# EAGLE board メイン基盤 (EAGLE 9.7.0)
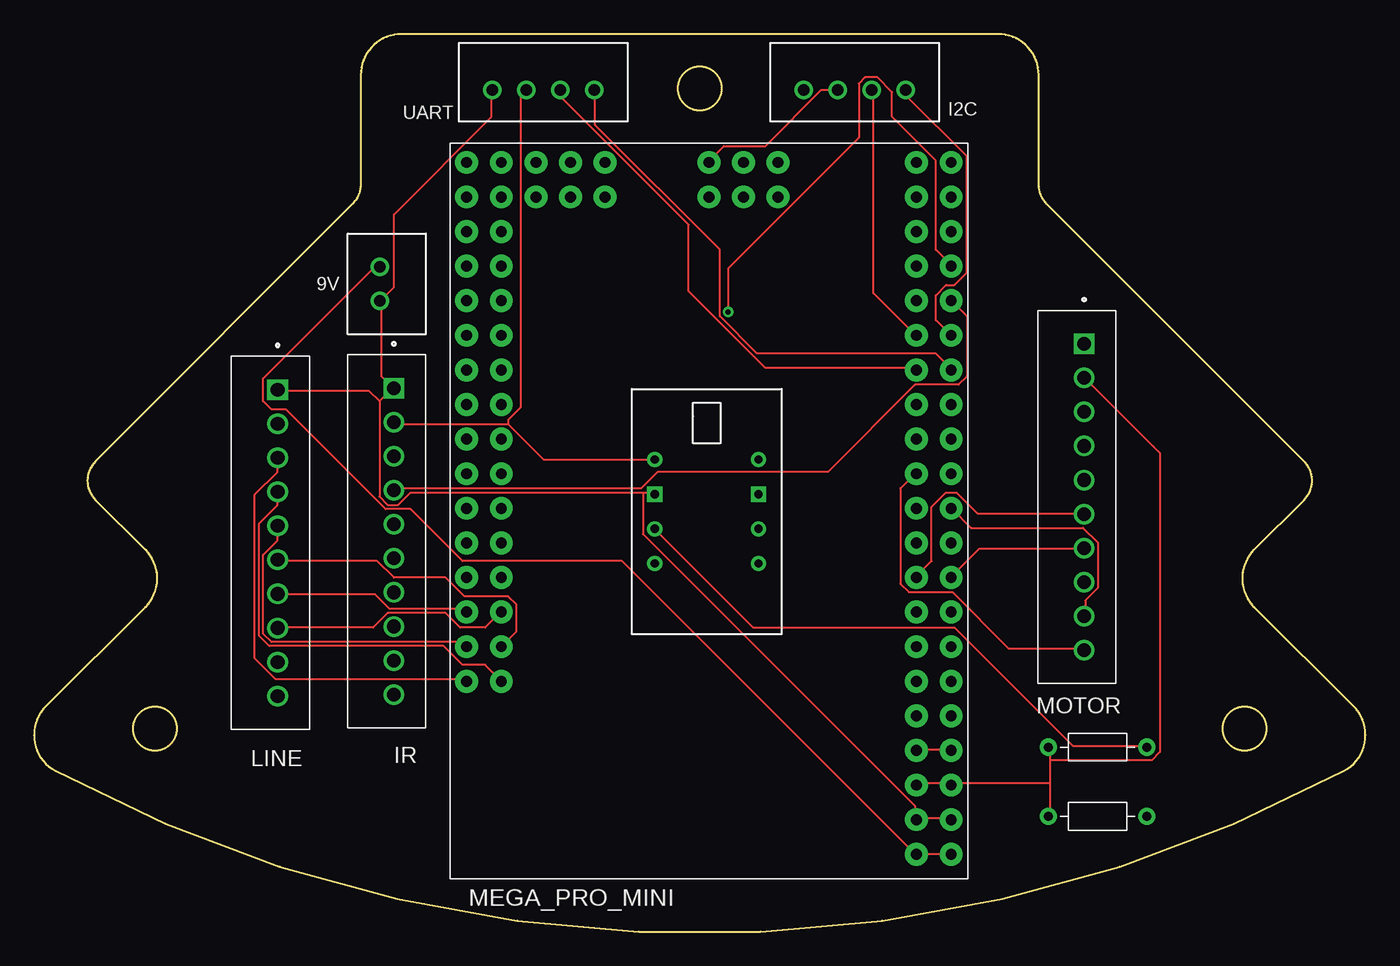
[diagram p0: board, top side]
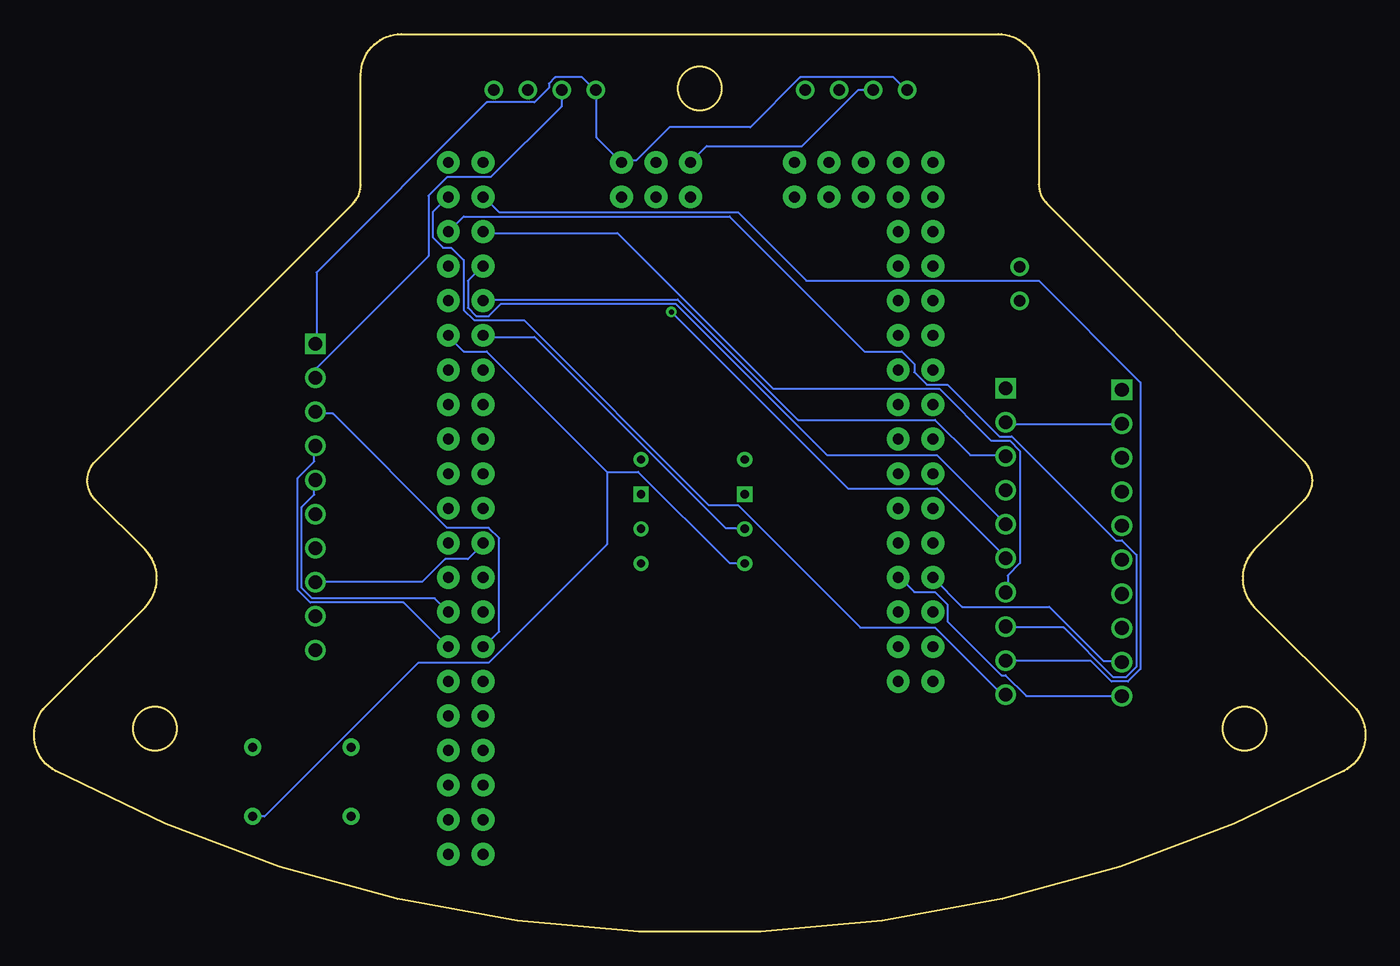
[diagram p1: board, bottom side, seen from below]

Size 97.74 x 65.9 mm. Coordinates in mm from the lower left corner, seen from the top.
Outline: 1.58,11.79 arc56 96.16,11.79 arc107 96.86,16.55 89.6,23.81 arc-90 89.6,28.06 93.24,31.7 arc90 93.24,34.53 74.35,53.42 arc-45 73.76,54.84 73.76,62.9 arc90 70.76,65.9 26.98,65.9 arc90 23.98,62.9 23.98,54.86 arc-45 23.4,53.45 4.5,34.52 arc90 4.5,31.7 8.14,28.06 arc-90 8.14,23.81 0.88,16.55 arc107 1.58,11.79
Outline: circle at 48.87,61.9 radius 1.6
Outline: circle at 8.87,14.9 radius 1.6
Outline: circle at 88.87,14.9 radius 1.6
Copper layers (1*16): Top / Bottom
Stack-up Default Layer Stack: Top User Defined 0.035mm / Dielectric-1 User Defined 1.5mm / Bottom User Defined 0.035mm
Design rules: minimum drill size 0.35mm, minimum copper width all 20mil, minimum copper width 6mil, keepout clearance 0mil, drill distance 6mil, via restrict clearance 0mil, dimension clearance 40mil, restrict clearance 20mil, copper clearance wire_polygon to wire_polygon 6mil, copper clearance wire_polygon to pad_smd 6mil, copper clearance wire_polygon to via 6mil, copper clearance pad_smd to pad_smd 6mil, copper clearance pad_smd to via 6mil, copper clearance via to via 6mil, copper clearance smd to pad (same net) 6mil, copper clearance smd to via (same net) 6mil, copper clearance smd to smd (same net) 6mil

## Footprints (pad centres in the part's own frame; a part is rotated, then mirrored left to right if it is on the bottom)
B2B-XH-A = drill 0.84: 1 0,0; 2 2.5,0
BNO055 = drill 0.6 square: GND -1.27,-3.81; GND2 -1.27,3.81 | drill 0.6: INT 1.27,3.81; RESET 3.81,3.81; SCL 3.81,-3.81; SDA 1.27,-3.81; VIN -3.81,-3.81; VOUT -3.81,3.81
B4B-XH-A = drill 0.84: 1 0,0; 2 2.5,0; 3 5,0; 4 7.5,0
JST_B10B-XH-A(LF)(SN) = drill 1 square: 1 11.25,-0.525 | drill 1: 2 8.75,-0.525; 3 6.25,-0.525; 4 3.75,-0.525; 5 1.25,-0.525; 6 -1.25,-0.525; 7 -3.75,-0.525; 8 -6.25,-0.525; 9 -8.75,-0.525; 10 -11.25,-0.525
MODULE_MEGA_PRO_EMBED_CH340G_/_ATMEGA2560 = drill 0.8 pad 1.676: 3V3_1 -17.58,-17.78; 3V3_2 -17.58,-15.24; 5V_1 -20.12,-17.78; 5V_2 -20.12,-15.24; 5V_3 25.6,0; A0 -12.5,17.78; A1 -12.5,15.24; A2 -9.96,17.78; A3 -9.96,15.24; A4 -7.42,17.78; A5 -7.42,15.24; A6 -4.88,17.78; A7 -4.88,15.24; A8 -2.34,17.78; A9 -2.34,15.24; A10 0.2,17.78; A11 0.2,15.24; A12 2.74,17.78; A13 2.74,15.24; A14 5.28,17.78; A15 5.28,15.24; AREF -15.04,-15.24; D2 -9.96,-15.24; D3 -9.96,-17.78; D4 -7.42,-15.24; D5 -7.42,-17.78; D6 -4.88,-15.24; D7 -4.88,-17.78; D8 -2.34,-15.24; D9 -2.34,-17.78; D10 0.2,-15.24; D11 0.2,-17.78; D12 2.74,-15.24; D13 2.74,-17.78; D14 5.28,-15.24; D15 5.28,-17.78; D16 7.82,-15.24; D17 7.82,-17.78; D18 10.36,-15.24; D19 10.36,-17.78; D20 12.9,-15.24; D21 12.9,-17.78; D22 15.44,-15.24; D23 15.44,-17.78; D24 17.98,-15.24; D25 17.98,-17.78; D26 20.52,-15.24; D27 20.52,-17.78; D28 23.06,-15.24; D29 23.06,-17.78; D30 25.6,-15.24; D31 25.6,-17.78; D32 7.82,17.78; D33 7.82,15.24; D34 10.36,17.78; D35 10.36,15.24; D36 12.9,17.78; D37 12.9,15.24; D38 15.44,17.78; D39 15.44,15.24; D40 17.98,17.78; D41 17.98,15.24; D42 20.52,17.78; D43 20.52,15.24; D44 23.06,17.78; D45 23.06,15.24; D46 25.6,17.78; D47 25.6,15.24; D48 25.6,12.7; D49 23.06,12.7; D50 25.6,10.16; D51 23.06,10.16; D52 25.6,7.62; D53 23.06,7.62; GND_1 -22.66,-17.78; GND_2 -22.66,-15.24; GND_3 25.6,-5.08; MISO 23.06,0; MOSI 25.6,-2.54; RESET 23.06,-5.08; RST -15.04,-17.78; RX -12.5,-15.24; SCK 23.06,-2.54; TX -12.5,-17.78; VIN_1 -25.2,-17.78; VIN_2 -25.2,-15.24
RESAD724W46L381D178B = drill 0.66 pad 1.26: 1 -3.62,0; 2 3.62,0

## Placement (x,y rotation side)
9V  B2B-XH-A  [B2B-XH-A]  25.38,46.31 90 top
BNO055  BNO055  [BNO055]  49.38,30.84 270 top
I2C  B4B-XH-A  [B4B-XH-A]  56.49,61.8 0 top
IR  B10B-XH-A(LF)(SN)  [JST_B10B-XH-A(LF)(SN)]  25.88,28.65 90 top
LINE  B10B-XH-A(LF)(SN)  [JST_B10B-XH-A(LF)(SN)]  17.36,28.54 90 top
MEGA_PRO_MINI  MEGA_PRO_EMBED_CH340G_/_ATMEGA2560  [MODULE_MEGA_PRO_EMBED_CH340G_/_ATMEGA2560]  49.55,30.88 90 top
MOTOR  B10B-XH-A(LF)(SN)  [JST_B10B-XH-A(LF)(SN)]  76.56,31.9 90 top
R1  10k  [RESAD724W46L381D178B]  78.08,13.54 0 top
R2  10k  [RESAD724W46L381D178B]  78.08,8.46 0 top
UART  B4B-XH-A  [B4B-XH-A]  33.63,61.8 0 top

## Library data of the parts
9V = Connector; CATEGORY: Header; DESCRIPTION: Connector Header Through Hole 2 position 0.098" (2.50mm); MANUFACTURER: JST Sales America Inc.; MPN: B2B-XH-A(LF)(SN); OPERATING_TEMPERATURE: -25°C ~ 85°C; PART_STATUS: ACTIVE; PITCH: 0.098" (2.50mm); ROHS_COMPLIANCE: ROHS3 Compliant; SERIES: XH; SUB_CATEGORY: Rectangular Connectors; TYPE: Header, Male Pin, Board to Cable/Wire, Through Hole
BNO055 = BNO055
I2C UART = Connector; CATEGORY: Header; DSECRIPTION: Connector Header Through Hole 4 position 0.098" (2.50mm); MANUFACTURER: JST Sales America Inc.; MPN: B4B-XH-A(LF)(SN); OPERATING_TEMPERATURE: -25 C to 85 C; PART_STATUS: ACTIVE; PITCH: 0.098" (2.50mm); ROHS_COMPLIANCE: ROHS3 Compliant; SERIES: XH; SUB_CATEGORY: Rectangular Connectors; TYPE: Header, Male Pin, Board to Cable/Wire, Through Hole
IR LINE MOTOR = B10B-XH-A_LF__SN_; AVAILABILITY: In Stock; CHECK_PRICES: https://www.snapeda.com/parts/B10B-XH-A%20(LF)(SN)/JST+Sales+America+Inc./view-part/?ref=eda; DESCRIPTION: Connector Header Through Hole 10 position 0.098 (2.50mm); MF: JST Sales; MP: B10B-XH-A (LF)(SN); PACKAGE: None; PRICE: None; SNAPEDA_LINK: https://www.snapeda.com/parts/B10B-XH-A%20(LF)(SN)/JST+Sales+America+Inc./view-part/?ref=snap
MEGA_PRO_MINI = MEGA_PRO_EMBED_CH340G___ATMEGA2560; AVAILABILITY: Not in stock; CHECK_PRICES: https://www.snapeda.com/parts/Mega%20Pro%20Embed%20CH340G%20/%20ATmega2560/Robotdyn/view-part/?ref=eda; MF: Robotdyn; MP: Mega Pro Embed CH340G / ATmega2560; PACKAGE: None; PRICE: None; SNAPEDA_LINK: https://www.snapeda.com/parts/Mega%20Pro%20Embed%20CH340G%20/%20ATmega2560/Robotdyn/view-part/?ref=snap
R1 R2 = Resistor; CATEGORY: Resistor; SUB-CATEGORY: Fixed

## Nets
3V3: MEGA_PRO_MINI.3V3_1 MEGA_PRO_MINI.3V3_2
5V: BNO055.VIN I2C.2 IR.2 LINE.2 MEGA_PRO_MINI.5V_1 MEGA_PRO_MINI.5V_2 MEGA_PRO_MINI.5V_3 MOTOR.2 R1.1 R2.1 UART.2
9V: 9V.2 MEGA_PRO_MINI.VIN_1 MEGA_PRO_MINI.VIN_2
GND: 9V.1 BNO055.GND I2C.1 IR.1 LINE.1 MEGA_PRO_MINI.GND_1 MEGA_PRO_MINI.GND_2 MEGA_PRO_MINI.GND_3 MOTOR.1 UART.1
IR_D1: IR.3 MEGA_PRO_MINI.D22
IR_D2: IR.4 MEGA_PRO_MINI.D23
IR_D3: IR.5 MEGA_PRO_MINI.D24
IR_D4: IR.6 MEGA_PRO_MINI.D25
IR_D5: IR.7 MEGA_PRO_MINI.D26
IR_D6: IR.8 MEGA_PRO_MINI.D27
IR_D7: IR.9 MEGA_PRO_MINI.D28
IR_D8: IR.10 MEGA_PRO_MINI.D29
LINE_D1: LINE.3 MEGA_PRO_MINI.A0
LINE_D2: LINE.4 MEGA_PRO_MINI.A1
LINE_D3: LINE.5 MEGA_PRO_MINI.A2
LINE_D4: LINE.6 MEGA_PRO_MINI.A3
LINE_D5: LINE.7 MEGA_PRO_MINI.A4
LINE_D6: LINE.8 MEGA_PRO_MINI.A5
LINE_D7: LINE.9 MEGA_PRO_MINI.A6
LINE_D8: LINE.10 MEGA_PRO_MINI.A7
M1_D1: MEGA_PRO_MINI.D2 MOTOR.3
M1_D2: MEGA_PRO_MINI.D3 MOTOR.4
M2_D1: MEGA_PRO_MINI.D5 MOTOR.5
M2_D2: MEGA_PRO_MINI.D6 MOTOR.6
M3_D1: MEGA_PRO_MINI.D7 MOTOR.7
M3_D2: MEGA_PRO_MINI.D8 MOTOR.8
M4_D1: MEGA_PRO_MINI.D11 MOTOR.9
M4_D2: MEGA_PRO_MINI.D12 MOTOR.10
RX: MEGA_PRO_MINI.D19 UART.4
SCL: BNO055.SCL I2C.4 MEGA_PRO_MINI.D21 R2.2
SDA: BNO055.SDA I2C.3 MEGA_PRO_MINI.D20 R1.2
TX: MEGA_PRO_MINI.D18 UART.3

## Tracks (layer width: path | path; a pad name or v marks a point on that pad's centre or on a via)
3V3
  Top 0.152: MEGA_PRO_MINI.3V3_2 64.82,13.34 67.26,13.34 MEGA_PRO_MINI.3V3_1
5V
  Top 0.152: 34.8,37.26 37.39,34.67 45.47,34.67 BNO055.VIN | 34.8,37.26 26.42,37.26 IR.2 | MEGA_PRO_MINI.5V_2 64.82,10.9 67.26,10.9 MEGA_PRO_MINI.5V_1 67.41,10.9 74.58,10.9 | 74.58,12.57 74.58,13.49 R1.1 | 74.58,12.57 74.58,10.9 | 74.58,10.9 74.58,8.46 R2.1 | I2C.2 58.88,61.8 57.81,61.8 53.7,57.68 50.65,57.68 49.58,56.62 MEGA_PRO_MINI.5V_3 | 74.58,12.57 82.04,12.57 82.65,13.18 82.65,35.13 77.17,40.62 MOTOR.2 | 34.8,37.26 34.8,37.57 35.71,38.48 35.71,61.49 36.02,61.8 UART.2
  Bottom 0.152: LINE.2 18.03,37.26 26.26,37.26 IR.2 | UART.2 36.17,61.8 37.24,61.8 41.35,57.68 48.36,57.68 49.43,56.62 MEGA_PRO_MINI.5V_3 | MOTOR.2 77.01,40.77 77.01,41.38 68.78,49.61 68.78,54.03 67.41,55.4 64.21,55.4 59.03,60.58 59.03,61.8 I2C.2
9V
  Top 0.152: 9V.2 25.35,48.69 24.89,48.69 16.82,40.62 16.82,38.94 17.43,38.33 18.49,38.33 25.81,31.01 27.64,31.01 31.45,27.2 43.18,27.2 64.67,5.72 MEGA_PRO_MINI.VIN_2 64.82,5.72 67.26,5.72 MEGA_PRO_MINI.VIN_1
GND
  Top 0.152: MEGA_PRO_MINI.GND_1 67.26,8.31 64.82,8.31 MEGA_PRO_MINI.GND_2 64.67,8.31 64.67,9.22 44.7,29.19 44.7,32.23 | 44.7,32.23 27.64,32.23 26.72,31.32 25.96,31.32 25.35,31.93 25.35,38.94 | 44.7,32.23 45.47,32.23 BNO055.GND | 25.35,38.94 26.26,39.85 IR.1 26.26,40.01 25.5,40.77 25.5,46.25 9V.1 25.5,46.41 26.42,47.32 26.42,52.66 33.58,59.82 33.58,61.8 UART.1 | 25.35,38.94 24.59,39.7 18.03,39.7 LINE.1
  Bottom 0.152: MOTOR.1 77.01,43.21 77.01,48.39 64.52,60.89 61.01,60.89 59.94,61.95 59.94,62.26 59.49,62.71 57.51,62.71 56.59,61.8 I2C.1 56.44,61.8 56.44,58.29 54.76,56.62 MEGA_PRO_MINI.GND_3 54.61,56.62 53.54,56.62 51.11,59.06 45.16,59.06 41.5,62.71 34.65,62.71 33.73,61.8 UART.1
IR_D1
  Bottom 0.152: IR.3 26.42,34.98 29.01,34.98 31.6,37.57 41.66,37.57 50.5,46.41 64.67,46.41 MEGA_PRO_MINI.D22
IR_D2
  Top 0.152: IR.4 26.42,32.54 44.55,32.54 45.77,33.76 58.27,33.76 64.67,40.16 67.87,40.16 68.48,40.77 68.48,45.19 67.41,46.25 MEGA_PRO_MINI.D23
IR_D3
  Bottom 0.152: IR.5 26.42,29.95 31.45,34.98 39.52,34.98 50.65,46.1 63.45,46.1 64.36,45.19 65.28,45.19 65.89,45.8 65.89,47.78 64.82,48.85 MEGA_PRO_MINI.D24
IR_D4  (via drill 0.35)
  Top 0.152: v50.95,45.49 50.95,48.69 60.55,58.29 60.55,62.26 61.01,62.71 61.93,62.71 62.99,61.65 62.99,59.82 66.19,56.62 66.19,50.06 67.26,49 MEGA_PRO_MINI.D25
  Bottom 0.152: v50.95,45.49 38,32.54 31.45,32.54 26.42,27.51 IR.6
IR_D5
  Bottom 0.152: IR.7 26.26,24.92 26.26,26.14 25.35,27.05 25.35,35.28 26.11,36.04 27.48,36.04 31.29,39.85 43.49,39.85 54.92,51.28 64.67,51.28 MEGA_PRO_MINI.D26
IR_D6
  Bottom 0.152: IR.8 26.26,22.33 22.15,22.33 18.49,18.67 17.58,18.67 16.82,19.43 16.82,27.66 17.88,28.73 18.34,28.73 25.96,36.35 26.87,36.35 30.68,40.16 32.21,40.16 33.12,41.07 33.12,41.68 34.04,42.6 36.78,42.6 46.69,52.5 66.19,52.5 67.26,51.44 MEGA_PRO_MINI.D27
IR_D7
  Bottom 0.152: IR.9 26.26,19.89 20.17,19.89 18.64,18.37 17.43,18.37 16.51,19.28 16.51,40.31 23.98,47.78 41.05,47.78 46.08,52.81 63.6,52.81 64.67,53.87 MEGA_PRO_MINI.D28
IR_D8
  Bottom 0.152: IR.10 26.42,17.45 26.72,17.45 31.6,22.33 37.08,22.33 46.08,31.32 48.21,31.32 61.77,44.88 65.43,44.88 66.19,45.65 66.19,49.3 67.11,50.22 67.72,50.22 68.48,50.98 68.48,52.81 67.41,53.87 MEGA_PRO_MINI.D29
LINE_D1
  Top 0.152: LINE.3 17.88,34.67 17.88,33.76 16.21,32.08 16.21,20.04 17.73,18.52 31.75,18.52 MEGA_PRO_MINI.A0
LINE_D2
  Top 0.152: LINE.4 17.88,32.23 17.88,31.32 16.51,29.95 16.51,21.72 17.27,20.96 30.07,20.96 31.45,19.58 33.12,19.58 34.19,18.52 MEGA_PRO_MINI.A1
LINE_D3
  Top 0.152: LINE.5 17.88,29.64 17.88,28.73 16.82,27.66 16.82,21.87 17.43,21.26 31.45,21.26 31.75,20.96 MEGA_PRO_MINI.A2
LINE_D4
  Top 0.152: LINE.6 18.03,27.2 25.2,27.2 26.42,25.99 30.23,25.99 31.6,24.61 34.8,24.61 35.41,24 35.41,22.02 34.34,20.96 MEGA_PRO_MINI.A3
LINE_D5
  Top 0.152: LINE.7 18.03,24.77 25.05,24.77 26.11,23.7 31.6,23.7 31.75,23.55 MEGA_PRO_MINI.A4
LINE_D6
  Top 0.152: LINE.8 18.03,22.33 24.89,22.33 25.96,23.39 30.23,23.39 31.29,22.33 33.12,22.33 34.19,23.39 MEGA_PRO_MINI.A5
LINE_D7
  Bottom 0.152: LINE.9 18.03,19.89 19.25,19.89 23.22,23.85 29.62,23.85 31.75,25.99 MEGA_PRO_MINI.A6
LINE_D8
  Bottom 0.152: LINE.10 18.03,17.3 24.89,17.3 26.42,18.82 26.72,18.82 30.68,22.79 30.68,24 31.6,24.92 33.12,24.92 34.19,25.99 MEGA_PRO_MINI.A7
M1_D1
  Bottom 0.152: MOTOR.3 77.01,38.03 75.79,38.03 67.41,29.64 64.36,29.64 63.6,28.88 63.6,22.02 64.67,20.96 MEGA_PRO_MINI.D2
M1_D2
  Bottom 0.152: MOTOR.4 77.17,35.59 77.17,34.52 78.39,33.3 78.39,25.07 77.47,24.16 70.61,24.16 67.41,20.96 MEGA_PRO_MINI.D3
M2_D1
  Bottom 0.152: MOTOR.5 77.17,33.15 77.17,32.08 78.08,31.17 78.08,25.22 77.32,24.46 68.33,24.46 67.41,23.55 MEGA_PRO_MINI.D5
M2_D2
  Top 0.152: MOTOR.6 77.01,30.71 69.24,30.71 67.72,32.23 66.96,32.23 65.89,31.17 65.89,27.2 64.82,26.14 MEGA_PRO_MINI.D6
M3_D1
  Top 0.152: MOTOR.7 77.01,28.12 69.39,28.12 67.41,26.14 MEGA_PRO_MINI.D7
M3_D2
  Bottom 0.152: MOTOR.8 77.01,25.68 69.24,25.68 67.56,27.36 65.89,27.36 64.82,28.42 MEGA_PRO_MINI.D8
M4_D1
  Top 0.152: MOTOR.9 77.17,23.24 77.17,24.31 78.08,25.22 78.08,28.58 77.01,29.64 68.78,29.64 67.41,31.01 MEGA_PRO_MINI.D11
M4_D2
  Top 0.152: MOTOR.10 77.01,20.8 71.53,20.8 67.41,24.92 64.21,24.92 63.6,25.53 63.6,32.54 64.67,33.61 MEGA_PRO_MINI.D12
RX
  Top 0.152: UART.4 41.2,61.8 41.2,59.21 50.34,50.06 50.34,45.19 53.09,42.44 66.19,42.44 67.26,41.38 MEGA_PRO_MINI.D19
SCL
  Top 0.152: I2C.4 64.06,61.8 64.06,61.34 68.48,56.92 68.48,48.39 67.56,47.47 66.96,47.47 66.19,46.71 66.19,44.88 67.26,43.82 MEGA_PRO_MINI.D21
  Bottom 0.152: 55.68,33.76 53.39,33.76 46.69,27.05 45.62,27.05 BNO055.SCL | 55.68,33.76 64.52,42.6 66.19,42.6 67.26,43.66 MEGA_PRO_MINI.D21 | 55.68,33.76 55.68,28.42 64.36,19.74 69.55,19.74 80.82,8.46 81.59,8.46 R2.2
SDA
  Top 0.152: R1.2 81.59,13.64 76.25,13.64 67.56,22.33 52.78,22.33 45.62,29.49 BNO055.SDA | I2C.3 61.62,61.8 61.62,46.86 64.67,43.82 MEGA_PRO_MINI.D20
  Bottom 0.152: BNO055.SDA 45.62,29.64 46.99,29.64 61.01,43.66 64.67,43.66 MEGA_PRO_MINI.D20
TX
  Top 0.152: UART.3 38.76,61.8 38.76,61.19 48.06,51.89 48.06,47.02 53.7,41.38 64.67,41.38 MEGA_PRO_MINI.D18